# Altium PCB ePBR22_ACC_Charging.PcbDoc (part 3 of 3)
Units mil, origin at the board's own origin, x right, y up, seen from the top; angles counter-clockwise.
Board outline 10580 x 3865 mil, 2 copper layers (Top Layer, Bottom Layer); 147 components, 103 nets, 520 pads, 142 vias.
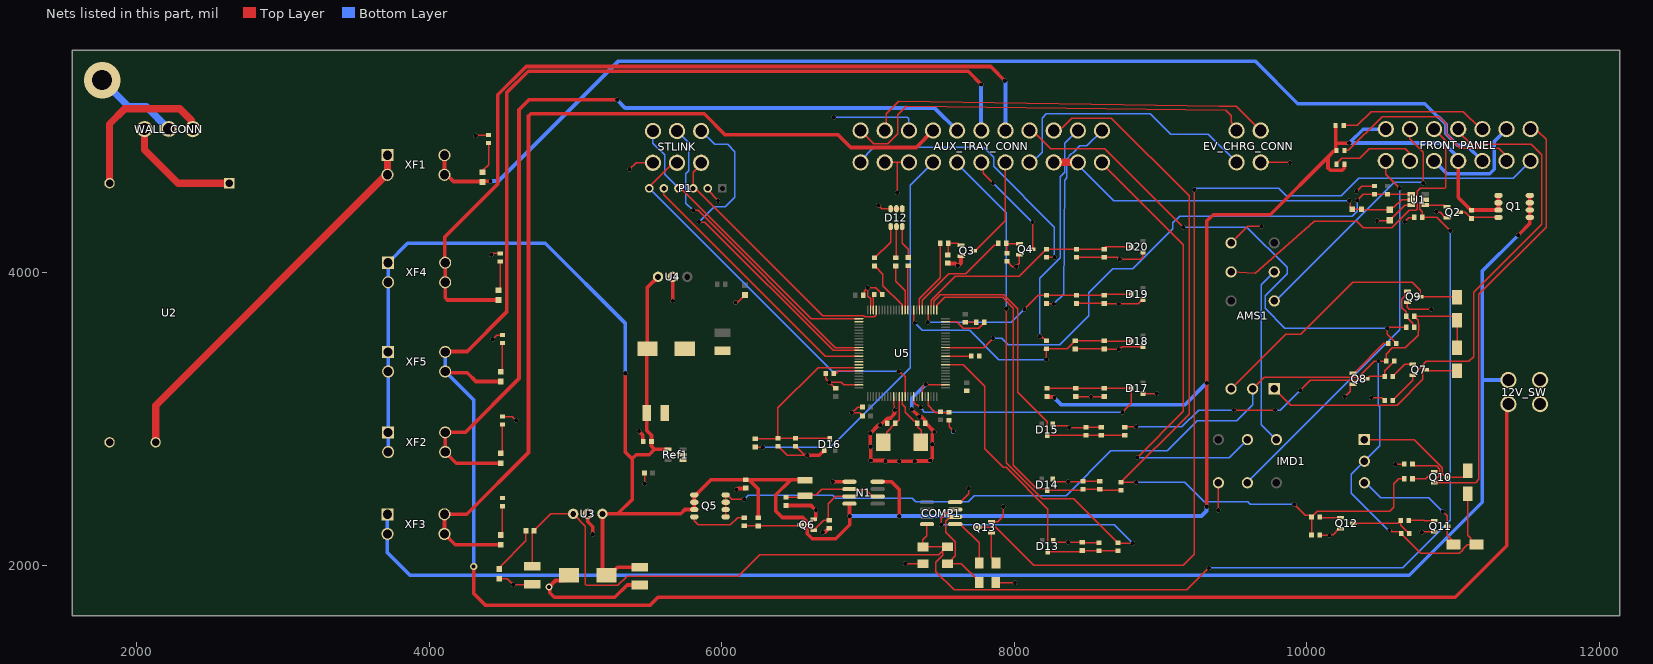
[diagram p2: the nets of this part, all layers, seen from the top]

## Via types
v1: diameter 30, hole 30, Top Layer to Bottom Layer, 126 vias
v2: diameter 178, hole 128, Top Layer to Bottom Layer, 10 vias
v3: diameter 250, hole 137, Top Layer to Bottom Layer, 4 vias
v4: diameter 50, hole 28, Top Layer to Bottom Layer, 2 vias

## Nets (pads, with @x,y where several pads share a name; then routed paths per layer and width w, separated by ;. In a path a pad name is that pad's centre, name@x,y a point inside that pad or via, vN(x,y) a via of type N, cw(c..) or ccw(c..) an arc to the next point about the centre after c; other vN are vias at no path point) (continued)
5V: C1.1 C6.2 C29.2 COMP1.8 R18.1 R59.1 U1.5 U3.3 | length 10293.3
  Top Layer w10: C6.2@4705,1991.01 4705,2220.46 4717.56,2233.02 R18.1@4717.56,2234.99 4717.56,2236.96 4830.59,2349.99 U3.3@4985,2349.99 5068.09,2266.9 5068.09,1866.91 5074,1861 5291,1861 5355,1925 6115,1925 6260,2070 7483.07,2070 R59.1@7512.6,2099.53 ; COMP1.8@7403.54,2280 7403.54,2201.46 7375,2172.91 C29.2@7375,2123.82 7379.02,2123.82 R59.1@7536.89,2123.82 ; R59.1@7545,2124.06 7544.76,2123.82 R59.1@7536.89,2123.82 ; v1(9330,1980) 9180,1830 7909.19,1830 7908.92,1829.72 7839.19,1829.72 7838.92,1830 7795.02,1830 7794.74,1829.72 7725.02,1829.72 7724.75,1830 7590,1830 7465,1955 7465,2020.56 7512.6,2068.15 R59.1@7512.6,2099.53 ; U1.5@10809.49,4497.4 10800.71,4488.62 10785.01,4488.62 10783.04,4486.65 10778.57,4486.65 10771.02,4479.11 10771.02,4433.98 10789.8,4415.2 C1.1@10789.8,4377.4 10887.6,4377.4 v1(10980,4285) ; R59.1@7512.6,2099.53 R59.1@7536.89,2123.82
  Bottom Layer w10: v1(9330,1980) 10655,1980 10980,2305 v1(10980,4285)
5V_ON: D2.1 R18.2 | length 320
  Top Layer w10: D2.1@4485,1988.45 4662.44,2165.9 R18.2@4662.44,2234.99
12V: "FRONT PANEL.1" "FRONT PANEL.11" C2.1 C3.1 C4.2 C5.2 C9.2 C10.1 N1.4 N1.8 Q1.1 Q1.2 Q1.3 Q5.1 Q5.2 Q5.3 R1.2 R2.2 R3.1 R8.2 R21.2 R23.2 R51.1 Ref1.4 U3.1 U4.1 XF2.1 XF2.2 XF4.1 XF4.2 XF5.1 XF5.2 | length 18910.6
  Top Layer w25: v1(5340,3310) 5340,2775 5387.76,2727.24 ; 5390,2729.57 5390,2729.47 ; C5.2@5440,1986.02 5288.67,1986.02 5232.64,1929.99 C3.1@5212.95,1929.99 5185,1957.94 U3.1@5185,2349.99 5289.99,2349.99 ; 5540,2790 5505,2755 5415.53,2755 5390,2729.47 ; U4.1@5565,3969.99 5492.05,3897.04 C2.1@5492.05,3479.99 5488.98,3476.92 C4.2@5488.98,3040 5488.98,2917.75 5520,2886.72 5520,2845 5520,2813.15 5540.75,2792.4 Ref1.4@5633.43,2792.4 ; Q5.1@5812.72,2479.65 Q5.2@5812.72,2429.65 Q5.3@5812.72,2379.65 5749.65,2379.65 5719.99,2349.99 5289.99,2349.99 ; Q5.1@5823.54,2479.65 5926.1,2582.2 R23.2@6165,2582.2 6187.8,2582.2 ; R21.2@6250,2322.56 6250,2520 6187.8,2582.2 ; C10.1@6570,2580 6567.8,2582.2 6471.61,2582.2 ; N1.4@6873.54,2419.65 6874.27,2418.92 6874.27,2335.73 v1(6875,2335) 6875,2275 6780,2180 6620,2180 6585,2215 6585,2295 6555,2325 6415,2325 6370,2370 6370,2480.59 6471.61,2582.2 ; N1.8@7066.46,2569.65 7160.71,2569.65 7215,2515.36 v1(7215,2335) ; R51.1@8225,3152.44 8228.25,3149.19 8267.15,3149.19 8273.65,3142.69 v1(8275,3142.69) ; v1(9315,2400) v1(9315,3244.68) 9315,4350 9360,4395 9750,4395 10145,4790 ; R1.2@10197.44,5005 10197.44,4884.04 ; R3.1@10202.44,4835 10202.44,4831.06 10201.16,4829.78 10184.78,4829.78 10145,4790 ; R3.1@10202.44,4838.94 10197.44,4843.94 10197.44,4884.04 ; R2.2@10257.56,4740 10256.28,4738.72 10256.28,4714.64 10241.63,4700 10159.64,4700 10145,4714.64 10145,4790 ; v1@10289.06,4884.04 10197.44,4884.04 ; 11035,4765.89 11035,4763 11035,4513.39 11120.87,4427.52 11122.83,4427.52 R8.2@11126.08,4424.28 11128.58,4426.77 Q1.3@11309.96,4426.77 Q1.2@11309.96,4476.77 Q1.1@11309.96,4526.77 ; 5289.99,2349.99 5390,2450 5390,2729.47 ; 6187.8,2582.2 6471.61,2582.2
  Bottom Layer w25: XF2.2@3720.12,2773.07 XF2.1@3720.12,2906.93 XF5.2@3720.12,3323.07 XF5.1@3720.12,3456.93 XF4.2@3720.12,3933.07 XF4.1@3720.12,4066.93 3853.19,4200 4795,4200 5340,3655 v1(5340,3310) ; v1(6875,2335) v1(7215,2335) 9280,2335 9314.04,2369.04 9314.04,2399.04 v1(9315,2400) ; v1(8275,3142.69) 8322.69,3095 9165.32,3095 v1(9315,3244.68) ; 10540,4980 10385.01,4980 v1(10290.01,4885) 10887.19,4885 10890.94,4884.72 10944.71,4876.56 11040.77,4780.5
12V_TO_ENBLSW: "FRONT PANEL.12" D1.1 XF1.3 XF1.4 | length 7894.1
  Top Layer w25: XF1.3@4104.88,4801.93 XF1.4@4104.88,4668.07 4120.49,4668.07 4166.46,4622.1 D1.1@4359.03,4622.1 ; D1.1@4370.97,4624.04 4419.04,4624.04 v1(4420,4625)
  Bottom Layer w25: v1@4422.31,4625 4475,4625 5295,5445 9647.26,5445 9938.58,5153.69 10805.84,5153.69 10898.54,5060.99 10903.55,5060.99 10950.99,5013.55 10950.99,4949.01 11031.26,4868.74 11094.26,4868.74 11200,4763
A\M\S\_\O\K\: AUX_TRAY_CONN.8 R28.1 R31.1 | length 3631.4
  Top Layer w10: AUX_TRAY_CONN.8@8105,4970 8125,4970 8249.84,4845.16 8619.84,4845.16 v1(9155,4310) ; v1(10550,3620) 10550,3579.53 10612.56,3516.97 R28.1@10612.56,3515 ; v1@10560,3625 10560.55,3625.55 R31.1@10679.88,3625.55
  Bottom Layer w10: v1(9155,4310) 9590,4310 9865,4035 9865,3992.13 9715,3842.13 9715,3755 9850,3620 v1(10550,3620)
AIR+_CTRL: AUX_TRAY_CONN.18 Q3.3 | length 699.2
  Top Layer w10: Q3.3@7724.29,4149.65 7735.12,4149.65 7940.08,4354.61 AUX_TRAY_CONN.18@7940.08,4753.08
AIR+_FB: AUX_TRAY_CONN.11 R55.1 | length 1415.6
  Top Layer w10: R55.1@8207.28,3777.33 8218.03,3788.08 R55.1@8220,3788.08 8223.08,3785 v1(8270,3785)
  Bottom Layer w10: v1(8270,3785) 8337.12,3852.12 8343.68,4631.49 8360,4647.81 8360,4776.92 8368.52,4785.45 8373.05,4792.54 cw(c8435,4753) 8395.46,4814.95 8402.56,4819.48 8449.4,4866.33 8496.33,4866.33 AUX_TRAY_CONN.11@8600,4970
AIR-_CTRL: AUX_TRAY_CONN.17 Q4.3 | length 741.6
  Top Layer w10: AUX_TRAY_CONN.17@7775,4753 7787.91,4740.09 7787.91,4677.09 v1(7855,4610) ; Q4.3@8124.29,4159.65 8125,4160.35 v1(8125,4345)
  Bottom Layer w10: v1(7855,4610) 7857.5,4610 8122.5,4345 v1(8125,4345)
AIR-_FB: AUX_TRAY_CONN.12 R57.1 | length 1895.3
  Top Layer w10: R57.1@8220,4104.75 8220.25,4105 v1(8275,4105)
  Bottom Layer w10: AUX_TRAY_CONN.12@6950,4753 6950,4765 7040,4855 7790,4855 7858.69,4786.31 7858.69,4726.31 8275,4310 v1(8275,4105)
AMS_CHG_SAFETY: AUX_TRAY_CONN.19 EV_CHRG_CONN.3 | length 1839
  Bottom Layer w10: AUX_TRAY_CONN.19@8105,4753 8120.13,4753 8190,4822.88 8190,5055 8220,5085 8930.82,5085 9069.53,4946.29 9326.71,4946.29 EV_CHRG_CONN.3@9520,4753 EV_CHRG_CONN.3@9529.16,4743.84
AMS_CHR_PWR: AUX_TRAY_CONN.4 D7.1 XF3.3 XF3.4 | length 6514.6
  Top Layer w25: D7.1@4490,2139.15 4178.8,2139.15 XF3.4@4104.88,2213.07 XF3.3@4104.88,2346.93 4256.93,2346.93 4680,2770 4680,5070.36 4694.64,5085 5880.29,5085 6024.77,4940.51 6796.88,4940.51 6882.77,4854.63 7329.63,4854.63 AUX_TRAY_CONN.4@7445,4970
AMS_CHR_PWR_FUSE: 12V_SW.3 Q1.5 Q1.6 Q1.7 Q1.8 XF3.1 XF3.2 | length 10409.6
  Top Layer w25: v1(11445,4255) 11524.53,4334.53 Q1.5@11524.53,4376.77 ; Q1.5@11524.53,4390 Q1.6@11524.53,4426.77 Q1.7@11524.53,4476.77 Q1.8@11524.53,4526.77
  Bottom Layer w10: 11200,3265.35 11200,3271.54
  Bottom Layer w25: XF3.1@3715.12,2346.93 XF3.2@3715.12,2213.07 3715.12,2084.88 3870,1930 10700,1930 11200,2430 11200,3265.35 12V_SW.3@11373.46,3265.35 ; 11200,3271.54 11200,4010 v1(11445,4255)
AMS_CHRG_CTRL: R9.1 R10.2 U1.1 U5.40 | length 3814
  Top Layer w10: U5.40@7530.47,3487.13 7792.13,3487.13 v1(7855,3550) ; v1(10345,4495) 10384.84,4534.84 R9.1@10552.24,4534.84 ; R9.1@10552.26,4534.82 U1.1@10715,4534.8
  Bottom Layer w10: v1(7855,3550) 7915,3550 7960,3505 8310,3505 8510,3705 8510,3860 8675,4025 8810,4025 9085,4300 9085,4340 9130,4385 10310,4385 10345,4420 v1(10345,4495)
AMS_ERR_PIN: AMS1.A2 D5.1 Q9.3 | length 1915.8
  Top Layer w10: AMS1.A2@9482.36,3204.76 9854.74,3577.14 9957.42,3577.14 10315.28,3935 10720,3935 10776.73,3878.27 Q9.3@10776.73,3835.55 11022.44,3835.55 D5.1@11027.44,3830.55
AMS_LED: "FRONT PANEL.3" AMS1.21 | length 2236.7
  Top Layer w10: AMS1.21@9482.36,4003.98 9644.1,3993.92 9644.41,3993.9 9648.5,3993.9 10047.52,4346.2 10051.57,4348.7 10217.35,4348.7 10218.13,4349.48 10244.89,4349.48 10245.67,4348.7 10341.62,4348.7 10385.33,4305 10533.46,4305 ; 10535,4305 10580,4305 10699.45,4424.45 10745.64,4424.45 10755.12,4433.93 10755.12,4555.12 10775,4575 10944.14,4575 10950,4580.86 10950,4900 10902.5,4947.5 10870,4980
AMS_OK: Q8.3 R26.2 R27.1 R47.1 | length 2053.5
  Top Layer w10: R47.1@8755,2942.2 8757.8,2945 v1(8835,2945) ; v1(9500,3060) v1(9785,3060) ; v1(9955,3195) 10025,3265 10356.65,3265 10366.65,3275 10415.12,3275 10430.12,3290 R27.1@10532.44,3290 10532.44,3327.91 10597.56,3393.03 R26.2@10597.56,3395
  Bottom Layer w10: v1(8835,2945) 9145,2945 9260,3060 v1(9500,3060) ; v1(9785,3060) 9820,3060 v1(9955,3195)
AMS_PWR: 12V_SW.4 AUX_TRAY_CONN.6 D9.1 XF5.3 XF5.4 | length 16060.2
  Top Layer w25: XF5.4@4109.88,3323.07 4117.95,3315 4260,3315 4320.61,3254.39 D9.1@4490,3254.39 ; XF5.3@4109.88,3456.93 4112.95,3460 4260,3460 4530,3730 4530,5227.97 4677.02,5375 7685,5375 v1(7775,5285) ; v4(4305,1990) 4305,1805 4385,1725 5510,1725 5565,1780 11015,1780 11366.86,2131.86 11366.86,3088.86 12V_SW.4@11378,3100
  Bottom Layer w25: XF5.3@4109.88,3456.93 XF5.4@4109.88,3323.07 4305,3127.95 v4(4305,1990) ; AUX_TRAY_CONN.6@7770,4978.85 7772.69,4981.54 7772.69,5281.34 7775,5283.65 v1(7775,5285)
AMS_RST: "FRONT PANEL.4" Q7.2 R29.2 | length 2912.4
  Top Layer w10: R29.2@10587.56,3125 10587.56,3126.97 10723.15,3262.56 Q7.2@10723.15,3298.15 10733.98,3298.15 10740.79,3304.96 10740.79,3314.48 10776.22,3349.91 10776.22,3352.69 10783.76,3360.24 10786.55,3360.24 10818.16,3391.85 11106.85,3391.85 11140,3425 11140,3865 11605,4330 11605,4805 11535,4875 11125,4875 11036.67,4963.33
AMS_RST_PIN: AMS1.A1 D4.1 Q7.3 | length 1434.4
  Top Layer w10: AMS1.A1@9777.64,3204.76 9889.21,3093.19 10618.19,3093.19 10794.09,3269.09 10794.09,3328.74 10800.91,3335.55 Q7.3@10811.73,3335.55 10822.56,3335.55 10830.04,3328.07 D4.1@11027.44,3328.07
BL1: D12.6 R42.2 | length 227.9
  Top Layer w10: D12.6@7234.37,4313.62 7234.37,4198.43 7275,4157.8 R42.2@7275,4102.56
BOOT0: R38.1 U5.37 | length 175.2
  Top Layer w10: U5.37@7530.47,3428.07 7703.43,3428.07 R38.1@7705,3429.65
CHRG_LED_PWR: "FRONT PANEL.13" R3.2 | length 1423.7
  Top Layer w10: R3.2@10257.56,4835 10285,4835 10515,5065 10902.82,5065 10952.18,5015.65 10952.18,4947.82 11050,4850 11313,4850 11382.5,4780.5 11415,4748
GL1: D12.5 R41.2 | length 215.9
  Top Layer w10: R41.2@7190,4099.76 7195,4104.76 D12.5@7195,4313.62
GND: 12V_SW.1 12V_SW.2 "FRONT PANEL.6" "FRONT PANEL.10" AMS1.24 AUX_TRAY_CONN.3 AUX_TRAY_CONN.13 AUX_TRAY_CONN.14 C1.2 C2.2 C3.2 C4.1 C5.1 C6.1 C7.1 C8.1 C9.1 C11.1 C12.1 C13.2 C14.1 C15.1 C16.1 C17.1 C18.1 C19.1 C20.1 C21.1 C22.1 C23.1 C24.1 C25.1 C26.1 C27.1 C28.1 C29.1 C30.1 COMP1.4 D2.2 D3.2 D12.1 D12.2 D12.3 D13.1 D14.1 D15.1 D16.1 D17.1 D18.1 D19.1 D20.1 EV_CHRG_CONN.4 IMD1.24 N1.1 P1.2 Q2.2 Q3.2 Q4.2 Q6.2 Q8.2 Q9.2 Q11.2 Q12.2 Q13.2 R4.2 R5.2 R6.2 R7.2 R10.1 R12.1 R14.1 R16.1 R17.2 R23.1 R24.1 R25.1 R29.1 R33.1 R37.2 R38.2 R39.2 R44.1 R46.1 R48.1 R50.1 R52.1 R54.1 R56.1 R58.1 R60.1 Ref1.1 Ref1.2 STLINK.4 U1.3 U2.3 U3.2 U4.2 U5.10 U5.20 U5.27 U5.74 U5.99 | length 13649.6
  Top Layer w10: U2.3@1813.46,2837.09 U2.3@1815.55,2839.17 ; v1(4320,4935) 4322.32,4937.32 4404.46,4937.32 R17.2@4406.78,4939.65 ; v1@4426.35,4120 4436.47,4130.12 R4.2@4486.78,4130.12 ; v1@4436.35,3545 4462.57,3571.22 R6.2@4500.5,3571.22 ; D2.2@4480,1906.53 4533.47,1906.53 v1(4575,1865) 4701.03,1865 C6.1@4705,1868.97 ; R5.2@4501.78,3014.88 4568.76,3014.88 v1@4593.65,2990 ; v1(5370,4705) 5415,4750 STLINK.4@5530,4750 ; C8.1@5472.44,2630 5475,2627.44 v1(5475,2555) ; P1.2@5905,4575 5905,4565.41 5975,4495.41 v1(5975,4490) ; v1@6095.96,3795.96 6109.42,3795.96 D3.2@6160,3846.53 ; R50.1@6386.97,2812.09 6449.06,2750 v1(6585,2750) ; C24.1@6506.97,2812.09 6568.1,2750.96 ; R39.2@6712.44,3308.03 6712.44,3272.56 v1(6735,3250) v1@6735.59,3250 ; C20.1@6778.03,3207.56 v1@6735.59,3250 ; U5.99@6937.95,3231.22 6835.86,3231.22 6817.08,3250 v1@6735.59,3250 ; C19.1@6962.44,3020 6962.44,3021.97 6951.69,3032.72 6949.72,3032.72 6942.44,3040 v1(6890,3040) 6930,3080 C15.1@6962.44,3080 ; C18.1@6967.56,3844.65 6975.94,3853.03 6975.94,3870.94 v1(7000,3895) ; U5.74@7017.68,3744.02 7017.68,3819.74 7000,3837.42 v1(7000,3895) ; v1@7071.35,4460 7095.68,4435.67 D12.3@7155.63,4435.67 D12.2@7195,4435.67 D12.1@7234.37,4435.67 ; C14.1@7097.56,3849.65 7097.56,3851.61 7054.17,3895 v1(7000,3895) ; AUX_TRAY_CONN.13@7115,4753 7197.5,4753 ; U5.10@7175.16,3151.5 7175.16,3095 7180.16,3090 7180.16,3062.56 v1(7182.72,3060) ; v1(7200,4545) 7200,4750.5 7197.5,4753 ; v1(7255,2010) 7374.65,2010 C29.1@7375,2009.65 ; AUX_TRAY_CONN.14@7280,4753 7197.5,4753 ; U5.20@7372.01,3151.5 7372.01,3212.01 v1(7395,3235) 7398.7,3231.3 7530.39,3231.3 U5.27@7530.47,3231.22 U5.27@7530.55,3231.14 ; C12.1@7555,2990 7555,2945 v1(7585,2915) ; COMP1.4@7631.89,2430 7689.04,2487.15 v1@7689.04,2524.04 ; C16.1@7665,3659.65 C11.1@7739.88,3659.65 ; Q13.2@7844.29,2297.05 7887.05,2297.05 7924.04,2334.04 v1@7924.04,2399.04 ; R60.1@7874.06,1880 v1(8005,1880) ; R16.1@7951.97,4077.09 7988.1,4040.96 v1@8014.04,4040.96 ; v1@8015,4041.35 8035.71,4062.06 Q4.2@8035.71,4122.24 ; D14.1@8262.4,2589.02 8262.4,2587.05 8273.15,2576.3 8275.12,2576.3 8281.42,2570 v1(8370,2570) 8467.8,2570 C22.1@8470,2572.2 R46.1@8585,2572.2 ; D15.1@8262.4,2964.02 8262.4,2962.05 8273.15,2951.3 8358.29,2951.3 8369.59,2940 8487.8,2940 C23.1@8490,2942.2 R48.1@8595,2942.2 ; D13.1@8267.4,2169.02 8267.4,2167.05 8278.15,2156.3 8280.12,2156.3 8281.42,2155 v1(8370,2155) 8464.76,2155 C21.1@8465,2154.76 8467.56,2152.2 R44.1@8580,2152.2 ; R54.1@8417.71,3477.09 C26.1@8615.42,3477.09 8617.51,3475 v1(8715,3475) 8719.6,3475 8738.52,3493.91 D18.1@8879.37,3493.91 ; R52.1@8420,3152.44 8422.44,3150 v1(8525,3150) 8612.56,3150 C25.1@8615,3152.44 C25.1@8617.56,3155 ; R56.1@8425,3788.08 C27.1@8615.42,3788.08 8618.5,3785 v1(8715,3785) 8846.82,3785 8877.4,3815.58 D19.1@8879.37,3815.58 ; R58.1@8425,4104.75 C28.1@8615.42,4104.75 8703.9,4104.75 v1@8718.65,4090 ; v1(8720,4090) 8864.73,4090 8879.37,4104.64 D20.1@8879.37,4137.24 ; D17.1@8879.37,3172.24 8881.61,3170 v1(8975,3170) ; v1(9395,2375) 9395.35,2375.35 9395.35,2562.01 IMD1.24@9395.71,2562.36 ; AMS1.24@9482.36,4202.4 9594.96,4315 v1(9690,4315) ; EV_CHRG_CONN.4@9685,4753 9882,4753 v1(9885,4750) ; R37.2@10087.56,2205 v1(10155,2205) 10158.83,2208.83 10179.54,2208.83 10219.17,2248.46 Q12.2@10230,2248.46 ; v1(10260,3150) 10298.07,3188.07 10298.07,3230.79 10304.88,3237.6 Q8.2@10315.71,3237.6 ; v1(10340,4555) 10374.96,4589.96 R10.1@10462.24,4589.96 ; v1(10440,3145) 10512.44,3145 10519.72,3137.72 10521.69,3137.72 10532.44,3126.97 R29.1@10532.44,3125 ; v1(10480,4355) 10565.28,4355 10670.28,4460 U1.3@10715,4460 ; v1(10605,2690) R33.1@10667.44,2690 ; v1(10670,4345) 10670,4348.44 10696.99,4375.43 10732.72,4375.43 C1.2@10734.68,4377.4 ; Q9.2@10688.15,3798.15 10688.15,3761.85 10700,3750 v1(10850,3750) ; v1(10785,2225) 10786.73,2226.73 10868.98,2226.73 Q11.2@10870.71,2228.46 ; v1(10885,4415) 10888.83,4411.17 10910.95,4411.17 10947.13,4375 Q2.2@10957.95,4375
  Top Layer w25: v1(4425,4120) v1@4426.35,4120 ; v1(4435,3545) v1@4436.35,3545 ; R6.2@4500.5,3571.22 R6.2@4501.78,3572.5 ; v1@4593.65,2990 v1(4595,2990) ; C3.2@4957.05,1929.99 4921.25,1894.19 4864.19,1894.19 v4(4820,1850) 4824.78,1845.22 4824.78,1811.28 4856.07,1780 5270,1780 5353.98,1863.98 C5.1@5440,1863.98 ; U3.2@5085,2349.99 5085,2295.62 5119.04,2261.58 5119.04,2210.96 v1(5120,2210) ; v1(5435,2915) 5435,2913.65 5461.75,2886.9 5461.75,2848.25 C9.1@5465,2845 ; C4.1@5611.02,3040 C4.1@5611.02,3065.59 ; v1(5665,3805) U4.2@5665,3969.99 ; v1(6095,3795) v1@6095.96,3795.96 ; v1(6100,2515) 6101.35,2515 6110.19,2523.84 6161.75,2523.84 R23.1@6165,2527.09 ; R50.1@6385,2812.09 R50.1@6386.97,2812.09 ; R25.1@6440,2407.44 6611.21,2407.44 6643.65,2375 v1(6645,2375) ; C24.1@6505,2812.09 C24.1@6506.97,2812.09 ; v1(6585,2750) 6667.32,2750 6697.38,2780.06 6699.35,2780.06 6702.6,2783.31 D16.1@6702.6,2785.28 ; Q6.2@6629.29,2312.05 6638.74,2312.05 6639.43,2312.74 6639.43,2322.19 6644.04,2326.8 v1@6644.04,2374.04 ; v1@6690.96,2225.96 6706.55,2225.96 6733.03,2252.44 R24.1@6735,2252.44 ; R39.2@6712.44,3308.03 R39.2@6712.44,3310 ; v1(6760,2570) 6760.18,2569.82 6873.37,2569.82 N1.1@6873.54,2569.65 ; C20.1@6778.03,3207.56 C20.1@6780,3207.56 ; 7069.04,2954.04 v1(7015,2900) 7015,2816.35 7020,2811.35 v1(7020,2715) 7113.65,2715 7118.65,2710 v1(7215,2710) ; v1(7070,4460) v1@7071.35,4460 ; v1(7085,2955) 7134.4,3004.4 7153.7,3004.4 7154.65,3005.36 ; 7155,3005 7155,3007.05 7181.76,3033.81 7181.76,3059.04 v1(7182.72,3060) ; v1@7216.35,2708.65 7216.75,2709.04 7219.49,2709.04 7219.89,2708.65 7317.29,2708.65 7317.69,2709.04 7318.25,2709.04 v1@7318.65,2708.65 ; v1(7300,3065) v1(7350,3015) ; v1@7321.35,2708.65 7321.35,2710 7322.31,2710.96 7417.42,2710.96 7420.51,2714.04 7423.25,2714.04 v1@7423.65,2713.65 ; v1@7350.96,3014.04 7365.96,3014.04 7389.31,2990.69 7389.31,2973.25 C30.1@7392.56,2970 ; C30.1@7392.8,2972.2 v1(7455,2910) 7455,2908.65 7439.94,2893.59 7439.94,2825.06 v1@7440,2825 ; v1(7425,2715) 7425,2716.35 7440,2731.35 7440,2824.94 v1(7439.94,2825) ; R14.1@7545,4064.65 7548.25,4061.4 7597.25,4061.4 7613.65,4045 v1(7615,4045) 7635.71,4065.71 Q3.2@7635.71,4112.24 ; COMP1.4@7596.46,2430 COMP1.4@7631.89,2430 ; v1@7689.04,2524.04 v1(7690,2525) ; R38.2@7760.12,3427.68 R38.2@7760.12,3429.65 ; Q13.2@7844.29,2297.05 Q13.2@7853.74,2297.05 ; v1@7924.04,2399.04 v1(7925,2400) ; R16.1@7950,4077.09 R16.1@7951.97,4077.09 ; v1@8014.04,4040.96 v1(8015,4040) ; v1@8718.65,4090 v1(8720,4090)
  Top Layer w50: U2.3@1813.29,2836.91 U2.3@1813.46,2837.09
  Bottom Layer w10: v1(6765,5060) 7270,5060 7280,5050 AUX_TRAY_CONN.3@7280,4970
  Bottom Layer w25: v1(7300,3065) 7300,3140 v1(7395,3235) ; v1@7578.65,2910 7583.65,2915 v1(7585,2915) ; 10870,4763 10958,4675 11250,4675 11280.99,4705.99 11280.99,4895.99 11365,4980
  other v1: 6690,2225 7120,2710 7320,2710 7020,2810 8375,2940
GND_PWR: WALL_CONN.2 | length 593.8
  Bottom Layer w50: v3(1765,5315) 1945.8,5134.2 2065.8,5134.2 WALL_CONN.2@2220,4980
HV_CURR_SENS: AUX_TRAY_CONN.16 COMP1.3 R43.2 | length 4817.8
  Top Layer w10: v1(7500,2275) 7500,2318.98 7561.02,2380 COMP1.3@7596.46,2380 ; v1(7945,3751.81) 7945,2700 8192.83,2452.17 8408.07,2452.17 8708.03,2152.2 R43.2@8710,2152.2 8712.2,2150 v1(8810,2150)
  Bottom Layer w10: v1(7500,2275) 8685,2275 v1(8810,2150) ; AUX_TRAY_CONN.16@7600.3,4754.7 7945,4410 v1(7945,3751.81)
HVB_PWR: AUX_TRAY_CONN.7 D6.1 XF4.3 XF4.4 | length 5847.9
  Top Layer w25: XF4.3@4107.84,4066.93 4107.84,4242.84 4470,4605 4470,5214.47 4663.41,5407.87 7838.98,5407.87 7886.51,5360.34 7886.51,5358.49 v1(7935,5310) ; XF4.3@4110,4066.93 4110,3933.07 4110,3826.65 4124.64,3812.01 D6.1@4475,3812.01
  Bottom Layer w25: v1(7935,5310) 7935,5308.65 7940,5303.65 AUX_TRAY_CONN.7@7940,4959.82
IMD_ERR_PIN: D11.1 IMD1.A2 Q11.3 | length 882.4
  Top Layer w10: v1(10930,2365) 10959.29,2335.71 10959.29,2203.58 11000,2162.87 D11.1@11000,2130
  Bottom Layer w10: IMD1.A2@10393.35,2562.36 10402.64,2562.36 10505,2460 10835,2460 v1(10930,2365)
IMD_LED: "FRONT PANEL.8" IMD1.21 | length 2685.9
  Top Layer w10: 10540,4763 10540,4670 v1(10635,4575)
  Bottom Layer w10: IMD1.21@9578.91,2553.91 10635,3610 v1(10635,4575)
IMD_OK: AUX_TRAY_CONN.9 R32.1 R36.2 R37.1 R45.1 | length 5693.8
  Top Layer w10: AUX_TRAY_CONN.9@8270,4970 8289.33,4989.33 8329.33,4989.33 8394.5,5054.5 8664.41,5054.5 9195,4523.91 9195,3032.2 8742.72,2579.92 8742.72,2577.95 8731.97,2567.2 R45.1@8730,2567.2 8732.2,2565 v1(8835,2565) ; v1(9915,2415) 9989.14,2340.86 10021.69,2340.86 10032.44,2330.12 R36.2@10032.44,2328.27 ; R37.1@10032.44,2205 R36.2@10032.44,2328.27 ; R32.1@10667.44,2590 10630,2590 10595,2555 10595,2395.86 10567.56,2368.42 10070.63,2368.42 10032.44,2330.24 R36.2@10032.44,2328.27
  Bottom Layer w10: v1(8835,2565) 9165,2565 9298.19,2431.81 9595.48,2431.81 9612.29,2415 v1(9915,2415)
IMD_PWR: AUX_TRAY_CONN.5 D8.1 XF2.3 XF2.4 | length 6150.7
  Top Layer w25: D8.1@4490,2696.77 4186.18,2696.77 XF2.4@4109.88,2773.07 XF2.3@4109.88,2906.93 4246.93,2906.93 4615,3275 4615,5112.73 4682.27,5180 v1(5285,5180)
  Bottom Layer w25: v1(5285,5180) 5340,5125 5611.54,5125 5941.54,5125 6868.46,5125 7455,5125 AUX_TRAY_CONN.5@7610,4970
IMD_RESIST_IN: AUX_TRAY_CONN.15 R49.2 | length 2753.8
  Top Layer w10: R49.2@6230,2807.44 6232.09,2805.35 v1(6280,2805.35)
  Bottom Layer w10: v1@6280,2805 6745.01,2805 7288.19,3348.18 7288.19,4596.19 AUX_TRAY_CONN.15@7445,4753
IMD_RST: "FRONT PANEL.7" Q10.2 R33.2 | length 3211.6
  Top Layer w10: R33.2@10722.56,2690 10722.56,2688.03 10733.31,2677.28 10887.35,2677.28 10908.35,2656.29 10908.35,2613.35 10888.35,2593.35 10888.35,2570.28 Q10.2@10881.54,2563.46 ; Q10.2@10870.71,2563.46 Q10.2@10881.54,2563.46 ; 11579.9,4965 11635.28,4909.62 11635.28,4310.28 11175,3850 11175,2585 11153.46,2563.46 Q10.2@10881.54,2563.46
IMD_RST_PIN: D10.1 IMD1.A1 Q10.3 | length 862.8
  Top Layer w10: IMD1.A1@10393.35,2855 10734.92,2855 10926.22,2663.7 10926.22,2623.11 10948.46,2600.87 Q10.3@10959.29,2600.87 11071.54,2600.87 11100,2629.33 D10.1@11100,2644.61
LATCHING_Delayed: AMS1.A3 D4.2 D5.2 D10.2 D11.2 IMD1.A3 Q5.5 Q5.6 Q5.7 Q5.8 R26.1 R30.1 R34.1 | length 8533.5
  Top Layer w10: Q5.5@6027.28,2329.65 Q5.6@6027.28,2379.65 Q5.7@6027.28,2429.65 Q5.8@6027.28,2479.65 6038.11,2479.65 6067.76,2450 v1(6155,2450) ; AMS1.A3@9630,3204.76 9710.24,3285 10350,3285 10460,3395 v1(10490,3395) R26.1@10542.44,3395 10542.44,3442.44 10584.41,3484.41 10674.41,3484.41 10761.65,3571.65 10761.65,3600.53 10763.62,3602.5 10763.62,3648.6 10761.65,3650.57 10761.65,3671.93 10735,3698.58 R30.1@10735,3700.55 10999.96,3700.55 D5.2@11027.44,3673.07 D4.2@11027.44,3485.55 ; v1(10565,2240) 10570.41,2240 10582.7,2227.72 10634.25,2227.72 10645,2216.97 R34.1@10645,2215 ; R34.1@10645,2213.03 10778.03,2080 11043.41,2080 11064.61,2101.19 11064.61,2106.97 11097.63,2139.99 D11.2@11160,2139.99 ; D10.2@11100,2487.13 11100,2205 11122.4,2182.6 11122.4,2168.45 11140.86,2150 D11.2@11155,2150
  Bottom Layer w10: v1(6155,2450) 6182.19,2477.19 6759.44,2477.19 6778.74,2457.89 7304.58,2457.89 7328.39,2434.08 7685.65,2434.08 7726.56,2475 8355.07,2475 8660.07,2780 9045,2780 9250,2985 9520,2985 9630,3095 AMS1.A3@9630,3204.76 ; v1(10490,3395) 10490,3093.12 10500,3083.12 10500,2816.65 IMD1.A3@10393.35,2710 10305,2621.65 10305,2490 10551.17,2243.83 10561.17,2243.83 v1(10565,2240)
LED_B1: R42.1 U5.61 | length 304
  Top Layer w10: U5.61@7273.58,3744.02 7273.58,4046.02 R42.1@7275,4047.44
LED_G1: R41.1 U5.62 | length 352.7
  Top Layer w10: R41.1@7190,4044.65 7190,3939.45 7253.9,3875.55 U5.62@7253.9,3718.41
LED_R1: R40.1 U5.63 | length 380.2
  Top Layer w10: R40.1@7045,4044.65 7046.97,4044.65 7102.8,3988.81 7102.8,3909.51 7234.21,3778.09 U5.63@7234.21,3744.02
NetAUX_TRAY_CONN_1: AUX_TRAY_CONN.1 EV_CHRG_CONN.1 | length 2885.5
  Top Layer w10: AUX_TRAY_CONN.1@6950,4970 7040,4880 7135,4880 7202.47,4947.47 7202.47,5077.22 7261.28,5136.03 7265.48,5136.03 9445.24,5109.76 9485,5070 9485,5026.36 9520,4991.36 EV_CHRG_CONN.1@9520,4970
NetAUX_TRAY_CONN_2: AUX_TRAY_CONN.2 EV_CHRG_CONN.2 | length 2783.5
  Top Layer w10: AUX_TRAY_CONN.2@7115,4970 7124.47,4979.47 7124.47,5084.47 7210.8,5170.8 9399.8,5137.05 9519.39,5135.61 9585.72,5069.28 EV_CHRG_CONN.2@9685,4970
NetC21_2: C21.2 D13.3 R43.1 R44.2 U5.34 | length 2109.7
  Top Layer w10: U5.34@7555.98,3369.09 7556.89,3370 7649.99,3370 7798.62,3221.37 7798.62,2795.47 7926.36,2667.73 7944.07,2667.73 8230,2381.8 D13.3@8230,2090.28 8455.63,2090.28 C21.2@8465,2099.65 8467.56,2097.09 R44.2@8580,2097.09 R43.1@8710,2097.09
NetC22_2: C22.2 D14.3 R45.2 R46.2 U5.51 | length 2488.3
  Top Layer w10: U5.51@7470,3750 7470,3775 7525,3830 7920,3830 7995,3755 7995,2683.2 8155.21,2522.99 8214.25,2522.99 8225,2512.24 D14.3@8225,2510.28 8463.19,2510.28 C22.2@8470,2517.09 R46.2@8585,2517.09 8590,2512.09 R45.2@8730,2512.09
NetC23_2: C23.2 D15.3 R47.2 R48.2 U5.52 | length 2161.5
  Top Layer w10: U5.52@7450,3755 7450,3804.53 7493.35,3847.87 7927.4,3847.87 8024.29,3750.98 8024.29,3180 8225,2979.29 D15.3@8225,2885.28 8226.81,2887.09 C23.2@8490,2887.09 R48.2@8595,2887.09 R47.2@8755,2887.09
NetC24_2: C24.2 D16.3 R49.1 R50.2 U5.93 | length 1322.9
  Top Layer w10: 6250,2862.2 6380,2862.2 R50.2@6385,2867.2 C24.2@6505,2867.2 D16.3@6740,2867.2 ; R50.2@6385,2880 6385,3074.02 6660.32,3349.33 U5.93@6907.77,3349.33
NetC25_2: C25.2 D17.3 R51.2 R52.2 U5.17 | length 2260.9
  Top Layer w10: U5.17@7313.03,3125.98 7313.03,3111.97 7327.75,3097.25 7337.34,3097.25 7354.59,3080 v1(7360,3080) ; R51.2@8220,3202.56 R51.2@8225,3207.56 ; R51.2@8237.72,3196.81 8226.97,3207.56 R51.2@8225,3207.56 ; R52.2@8420,3207.56 R51.2@8225,3207.56 ; R52.2@8425.4,3207.56 C25.2@8615,3207.56 ; C25.2@8615,3204.49 8620.04,3204.49 8625.2,3209.65 D17.3@8800.63,3209.65 8800.63,3105.63 v1(8740,3045)
  Bottom Layer w10: v1(7360,3080) 7360,3074.59 7377.93,3056.66 7377.93,3052.07 7385,3045 v1(8740,3045)
NetC26_2: C26.2 D18.3 R53.2 R54.2 U5.59 | length 1788.8
  Top Layer w10: U5.59@7312.95,3744.02 7312.95,3667.46 7320,3660.41 v1(7320,3655) ; R53.2@8203.28,3467.2 R53.2@8205.25,3467.2 ; R53.2@8203.28,3477.95 R53.2@8214.03,3467.2 ; v1(8220,3405) R53.2@8220,3477.44 8221.97,3477.44 8360.98,3477.44 8415.74,3532.2 R54.2@8417.71,3532.2 C26.2@8615.42,3532.2 8616.31,3531.31 D18.3@8800.63,3531.31
  Bottom Layer w10: v1(7320,3655) 7370,3605 7695,3605 7895,3405 v1(8220,3405)
NetC27_2: C27.2 D19.3 R55.2 R56.2 U5.54 | length 1556.5
  Top Layer w10: v1(7410,3660) 7411.38,3661.38 U5.54@7411.38,3744.02 ; v1(8070,3750) 8163.2,3843.2 R55.2@8220,3843.2 R56.2@8425,3843.2 C27.2@8615.42,3843.2 8617.39,3843.2 C27.2@8627.17,3852.98 ; C27.2@8628.14,3853.95 C27.2@8627.17,3852.98 ; D19.3@8800.63,3852.98 C27.2@8627.17,3852.98
  Bottom Layer w10: v1(7410,3660) 7980,3660 v1(8070,3750)
NetC28_2: C28.2 D20.3 R57.2 R58.2 U5.53 | length 1564.6
  Top Layer w10: U5.53@7431.06,3769.53 7431.06,3810.87 7595.2,3975 8033.17,3975 8218.03,4159.87 R57.2@8220,4159.87 R58.2@8425,4159.87 C28.2@8610.42,4159.87 ; C28.2@8610.42,4162.9 C28.2@8610.42,4159.87 ; D20.3@8800.63,4174.65 8625.2,4174.65 C28.2@8610.42,4159.87
NetCOMP1_1: COMP1.1 R61.1 | length 354.2
  Top Layer w10: COMP1.1@7596.46,2280 7631.89,2280 7760.94,2150.94 R61.1@7760.94,2014.65
NetCOMP1_2: COMP1.2 R59.2 R60.2 | length 686.2
  Top Layer w10: R59.2@7545,2009.88 R59.2@7552.87,2009.88 ; COMP1.2@7596.46,2330 7561.02,2330 7532.24,2301.22 7532.24,2224.95 7597.4,2159.8 7597.4,2062.28 7577.4,2042.28 7577.4,2034.41 R59.2@7552.87,2009.88 ; R60.2@7759.88,1880 7759.88,1887.87 7637.87,2009.88 R59.2@7552.87,2009.88
NetD1_2: D1.2 R17.1 | length 202.3
  Top Layer w10: D1.2@4365,4695 4406.78,4736.78 R17.1@4406.78,4880
NetD6_2: D6.2 R4.1 | length 200.9
  Top Layer w10: D6.2@4475,3878.93 4486.78,3890.72 R4.1@4486.78,4075
NetD7_2: D7.2 R7.1 | length 200.9
  Top Layer w10: D7.2@4490,2206.08 4501.78,2217.87 R7.1@4501.78,2402.15
NetD8_2: D8.2 R5.1 | length 200.9
  Top Layer w10: D8.2@4490,2763.7 4501.78,2775.48 R5.1@4501.78,2959.76
NetD9_2: D9.2 R6.1 | length 200.9
  Top Layer w10: D9.2@4490,3321.32 4501.78,3333.1 R6.1@4501.78,3517.38
"NetFRONT PANEL_5": "FRONT PANEL.5" R1.1 | length 1086.5
  Top Layer w10: R1.1@10252.56,5005 10345,5005 10440,5100 11070,5100 11185.36,4984.64 11230.36,4984.64 11245.58,4969.42
"NetFRONT PANEL_9": "FRONT PANEL.9" R2.1 | length 678
  Top Layer w10: R2.1@10202.44,4740 10202.44,4743.94 10238.5,4780 10361.77,4780 10426.77,4845 10618.78,4845 cw(c10618.78,4835) 10620.99,4844.75 10673.25,4844.75 10755,4763 ; 10708.07,4759.54 ccw(c10717.64,4762.42) 10714.06,4753.09 10715.79,4752.42 10717.64,4752.42 10750.58,4752.42
"NetFRONT PANEL_14": "FRONT PANEL.14" Q13.3 | length 6526.5
  Top Layer w10: Q13.3@7755.71,2259.65 7875,2259.65 8135,1999.65 9154.65,1999.65 9230,2075 v1(9230,4565)
  Bottom Layer w10: v1(9230,4565) 9235.41,4565 9245.41,4575 9808.56,4575 9858.56,4525 10236.7,4525 10356.7,4645 11411.9,4645 11529.9,4763
NetQ1_4: Q1.4 Q2.3 R8.1 | length 285.6
  Top Layer w10: Q2.3@11046.54,4412.4 11082.84,4412.4 11113.37,4381.87 11113.37,4379.91 11124.11,4369.16 R8.1@11126.08,4369.16 11133.7,4376.77 Q1.4@11309.96,4376.77
NetQ2_1: Q2.1 U1.4 | length 152.7
  Top Layer w10: U1.4@10809.49,4460 10936.93,4460 10947.13,4449.8 Q2.1@10957.95,4449.8
NetQ3_1: Q3.1 R13.2 R14.2 | length 172.9
  Top Layer w10: R14.2@7545,4119.76 7550,4124.76 R13.2@7550,4199.65 7612.28,4199.65 7624.88,4187.05 Q3.1@7635.71,4187.05
NetQ4_1: Q4.1 R15.2 R16.2 | length 157.6
  Top Layer w10: R15.2@7945,4199.65 R15.2@7947.6,4197.05 ; R16.2@7950,4132.2 7950,4194.65 R15.2@7947.6,4197.05 ; Q4.1@8035.71,4197.05 R15.2@7947.6,4197.05
NetQ5_4: Q5.4 R22.2 | length 401.9
  Top Layer w10: Q5.4@5812.72,2329.65 5812.21,2329.14 5812.21,2302.79 5840,2275 6060,2275 6109.65,2324.65 R22.2@6155,2324.65
NetQ6_3: Q6.3 R21.1 R22.1 | length 387.8
  Top Layer w10: R22.1@6155,2269.53 6250,2269.53 6535.59,2269.53 Q6.3@6540.71,2274.65
NetQ7_1: Q7.1 R27.2 | length 171.1
  Top Layer w10: R27.2@10587.56,3290 10587.56,3291.97 10668.54,3372.95 Q7.1@10723.15,3372.95
NetQ8_1: Q8.1 R28.2 | length 327.1
  Top Layer w10: Q8.1@10315.71,3312.4 10326.54,3312.4 10333.35,3319.21 10333.35,3321.65 10526.69,3515 R28.2@10557.44,3515
NetQ9_1: Q9.1 R30.2 R31.2 | length 304.3
  Top Layer w10: Q9.1@10688.15,3872.95 10677.32,3872.95 10670.51,3866.14 10670.51,3836.17 10650.51,3816.17 10650.51,3759.49 10679.88,3730.12 10679.88,3698.58 10724.25,3654.21 10724.25,3636.3 R31.2@10735,3625.55
NetQ10_1: Q10.1 R32.2 | length 168.1
  Top Layer w10: R32.2@10722.56,2590 10811.61,2590 10859.88,2638.27 Q10.1@10870.71,2638.27
NetQ11_1: Q11.1 R35.1 | length 173.9
  Top Layer w10: R35.1@10697.56,2305 10802.14,2305 10803.87,2303.27 Q11.1@10870.71,2303.27
NetQ12_1: Q12.1 R36.1 | length 144.5
  Top Layer w10: R36.1@10087.56,2328.27 10092.56,2323.27 Q12.1@10230,2323.27
NetQ12_3: Q12.3 R34.2 R35.2 | length 465.1
  Top Layer w10: Q12.3@10318.58,2285.87 10625.28,2285.87 R35.2@10642.44,2303.03 ; R35.2@10629.72,2317.72 10631.69,2317.72 10642.44,2306.97 R35.2@10642.44,2305 R35.2@10642.44,2303.03 ; R34.2@10700.12,2215 10700.12,2216.97 10689.37,2227.72 10687.4,2227.72 10642.44,2272.68 R35.2@10642.44,2303.03
NetQ13_1: Q13.1 R61.2 | length 220.4
  Top Layer w10: Q13.1@7844.29,2222.24 7844.29,2053.35 7875.12,2022.52 R61.2@7875.12,2014.65
NetR13_1: R13.1 U5.57 | length 514.8
  Top Layer w10: U5.57@7352.13,3744.02 7352.13,3822.13 7494.88,3964.88 R13.1@7494.88,4199.65
NetR15_1: R15.1 U5.56 | length 722.1
  Top Layer w10: U5.56@7371.93,3769.53 7371.93,3811.93 7552.87,3992.87 7667.87,3992.87 7861.93,4186.93 7879.13,4186.93 7889.88,4197.68 R15.1@7889.88,4199.65
NetR39_1: R39.1 U5.94 | length 173.2
  Top Layer w10: R39.1@6775,3305 6799.65,3329.65 U5.94@6937.95,3329.65
NetU2_1: U2.1 WALL_CONN.1 | length 814.4
  Top Layer w50: WALL_CONN.1@2055,4980 2055,4840 2284.17,4610.83 U2.1@2634.45,4610.83
NetU2_2: U2.2 WALL_CONN.3 | length 1104.7
  Top Layer w50: U2.2@1815.55,4610.83 1815.55,5015.55 1920,5120 2295,5120 2373.33,5041.67 2373.33,4991.67 WALL_CONN.3@2385,4980
NetU2_4: U2.4 XF1.1 XF1.2 | length 2623.2
  Top Layer w50: U2.4@2130.51,2839.17 2130.51,3090.51 3708.07,4668.07 XF1.2@3715.12,4668.07 XF1.1@3715.12,4801.93
NetU5_77: U5.77
NetU5_91: U5.91
NetU5_92: U5.92
NRST: P1.6 STLINK.5 U5.14 | length 2675.5
  Top Layer w10: P1.6@5500,4583 STLINK.5@5682.5,4765.5 ; v1(7210,3325) 7214.99,3325 7253.9,3286.09 U5.14@7253.9,3151.5
  Bottom Layer w10: P1.6@5505,4575 6755,3325 v1(7210,3325)
OSC_IN: C13.1 U5.12 Y1.2 | length 373.2
  Top Layer w10: Y1.2@7073.29,2806.24 Y1.2@7102.05,2835 ; Y1.2@7102.05,2840 7128.2,2866.15 7128.2,2908.2 7187.8,2967.8 7214.53,2994.53 U5.12@7214.53,3125.98
OSC_OUT: C30.2 U5.13 Y1.1 | length 372.3
  Top Layer w10: U5.13@7234.21,3125.98 7234.21,3101.05 7255,3080.27 7255,3045 7317.28,2982.72 7326.69,2982.72 7337.44,2971.97 C30.2@7337.44,2970 7341.86,2965.58 7341.86,2943.14 7365,2920 Y1.1@7365,2813.35
RL1: D12.4 R40.2 | length 260.8
  Top Layer w10: R40.2@7045,4099.76 7046.97,4099.76 7155.63,4208.43 D12.4@7155.63,4313.62
Serial_Rx: STLINK.3 U5.87 | length 2370.7
  Top Layer w10: v1(5845,4345) 5885,4345 6762.56,3467.44 U5.87@6937.95,3467.44
  Bottom Layer w10: v1(5845,4345) 5948.98,4448.98 6023.98,4448.98 6090,4515 6090,4825 6040,4875 5952,4875 STLINK.3@5860,4967
Serial_Tx: STLINK.2 U5.86 | length 2125.6
  Top Layer w10: v1(5805,4425) 5840,4425 6777.87,3487.13 U5.86@6937.95,3487.13
  Bottom Layer w10: STLINK.2@5695,4967 5775,4887 5775,4695 5755,4675 5755,4475 v1(5805,4425)
SHCT_AMS_IMD: AMS1.11 IMD1.12 | length 1225.1
  Bottom Layer w10: AMS1.11@9777.64,4003.98 9690,3916.34 9690,2960.2 IMD1.12@9792.56,2857.64
SHCT_IN: "FRONT PANEL.2" AMS1.12 | length 1779.8
  Top Layer w10: AMS1.12@9769.09,3814.09 AMS1.12@9777.64,3805.55 ; 10705,4980 10705,4913.32 10795,4823.32 v1(10795,4610)
  Bottom Layer w10: AMS1.12@9777.64,3805.55 9787.88,3805.55 10598.8,4616.47 10779.14,4616.47 10781.79,4613.83 10791.95,4613.83 v1@10794.6,4616.47 ; v1@10789.59,4610 v1(10795,4610)
SHCT_INTERLOCK: AUX_TRAY_CONN.22 IMD1.11 | length 3195.4
  Top Layer w10: AUX_TRAY_CONN.22@8585.76,4759.24 9155,4190 9155,3050 v1(8840,2735)
  Bottom Layer w10: v1(8840,2735) 9471.5,2735 IMD1.11@9594.13,2857.64
SHCT_OUT: AUX_TRAY_CONN.20 AUX_TRAY_CONN.21 R11.1 R11.2 R12.2 U1.2 | length 2657.2
  Top Layer w10: v1(10290,4490) 10290,4484.59 10298.03,4476.56 10298.03,4445.12 R11.2@10310.75,4432.4 R11.1@10373.74,4432.4 10378.31,4427.83 R12.2@10567.24,4427.83 10583.9,4444.49 10595.93,4444.49 10648.84,4497.4 U1.2@10715,4497.4
  Top Layer w50: AUX_TRAY_CONN.20@8270,4753 AUX_TRAY_CONN.21@8435,4753
  Bottom Layer w10: AUX_TRAY_CONN.21@8410.55,4759.45 8680,4490 v1(10290,4490)
SHCT_TAP: AUX_TRAY_CONN.10 R53.1 | length 1586
  Top Layer w10: v1(8175,3565) 8178.83,3561.17 8189.42,3561.17 8218.03,3532.56 R53.1@8220,3532.56
  Bottom Layer w10: v1(8175,3565) 8175,3960.01 8314.95,4099.96 8314.95,4655 8345,4685.05 8345,4885 AUX_TRAY_CONN.10@8441.98,4981.98
SWCLK: P1.4 STLINK.1 U5.76 | length 2114.2
  Top Layer w10: P1.4@5705,4575 5718.27,4575 5732.26,4561.01 5733.99,4561.01 6611.02,3683.98 U5.76@6937.95,3683.98
  Bottom Layer w10: STLINK.1@5498.38,5001.62 5530,4970 5530,4885 5610,4805 5610,4670 P1.4@5705,4575
SWDIO: P1.3 STLINK.6 U5.72 | length 1875.4
  Top Layer w10: STLINK.6@5884.72,4764.72 5805,4685 P1.3@5805,4575 5818.27,4575 5832.26,4561.01 5833.99,4561.01 6690,3705 6970.69,3705 6977.19,3698.5 7043.5,3698.5 7057.05,3712.05 U5.72@7057.05,3744.02
SWO: P1.5 U5.89 | length 1834.4
  Top Layer w10: P1.5@5605,4575 5605,4530 6706.93,3428.07 U5.89@6937.95,3428.07
THRS_TRIG_PD: C10.2 N1.2 N1.6 R25.2 | length 672.2
  Top Layer w10: R25.2@6440,2462.56 6523.82,2462.56 6540.47,2479.21 6540.47,2481.5 6570,2481.5 6646.5,2481.5 6684.65,2519.65 6913.73,2519.65 6918.37,2515 6985.67,2515 7031.02,2469.65 N1.6@7066.46,2469.65
TIMER_OUT_PD: N1.3 Q6.1 R24.2 | length 406.4
  Top Layer w10: Q6.1@6629.29,2237.24 6699.61,2307.56 6730,2307.56 6730,2420 6779.65,2469.65 N1.3@6873.54,2469.65
V_CAP_1: C11.2 U5.49 | length 300.4
  Top Layer w10: U5.49@7530.47,3664.29 7608.68,3664.29 7652.97,3620 7757.32,3620 7795,3657.68 C11.2@7795,3659.65
V_CAP_2: C14.2 U5.73 | length 107.7
  Top Layer w10: U5.73@7037.36,3744.02 7037.36,3844.57 C14.2@7042.44,3849.65
VDDA: C12.2 L1.1 U5.22 | length 209
  Top Layer w10: U5.22@7411.38,3135 7411.38,3090.9 7450,3052.28 7450,3053.48 7463.48,3040 C12.2@7553.48,3040
pads on no net: AMS1.14 AMS1.22 COMP1.5 COMP1.6 COMP1.7 IMD1.14 IMD1.22 N1.5 N1.7 Ref1.3 Ref1.5 U1.6 U5.1 U5.2 U5.3 U5.4 U5.5 U5.6 U5.7 U5.8 U5.9 U5.15 U5.16 U5.18 U5.23 U5.24 U5.25 U5.26 U5.29 U5.30 U5.31 U5.32 U5.33 U5.35 U5.36 U5.38 U5.39 U5.41 U5.42 U5.43 U5.44 U5.45 U5.46 U5.47 U5.48 U5.55 U5.58 U5.60 U5.64 U5.65 U5.66 U5.67 U5.68 U5.69 U5.70 U5.71 U5.78 U5.79 U5.80 U5.81 U5.82 U5.83 U5.84 U5.85 U5.88 U5.90 U5.95 U5.96 U5.97 U5.98
copper on no net:
  other v2: 11882,3182.5 5530,5254 5860,5254 6950,5257 8600,5257 9602.5,5257 2055,5267 2385,5267 10540,5267 11529.88,5266.98
  other v3: 1765,1865 11915,1865 11915,5315

## Polygon pours and split planes (outlines as drawn)
GND on Top Layer "GND_L01_P008" (solid, remove dead copper, pour order 8): 3255,5435.56 3255,1720 11500,1720 12039.95,2371.35 12035,4700 11645,5420
GND on Top Layer "GND_L01_P032" (solid, remove dead copper, pour order 32): 1705,2940 1915,2940 1930,2925 1930,2755 3315,2755 3325,2745 3325,2555 1710,2555 1710,2930
GND on Bottom Layer "GND_L02_P033" (solid, remove dead copper, pour order 33): 3240.7,5480 3250.7,5470 12059.14,5470 12080.22,5430.93 12088.18,1725 3270.98,1725
GND on Bottom Layer "GND_L02_P031" (solid, remove dead copper, pour order 31): 1750,2925 1755,2930 1930,2930 1930,2750 3310,2750 3310,2565 3305,2560 1710,2560 1710,2925 1705,2930 1710,2935 1840,2935

## Other copper
Top Layer:
  pour cut-out: 7166.98,3038.66 7206.33,3260 7300,3260 7300,3090 7435,2955 7470,2955 7470,2680 6960,2680 6960,2950 7025,3015
Bottom Layer:
  pour cut-out: 7235,2651.45 7505,2651.45 7505,2940 7350,3095 7350,3220 7165,3220 7165,3020 6945,3020 6945,2648.55 7235,2651.45 7235,2685 6985,2685 6985,2920 7055,2990 7185,2990 7185,3205 7320,3205 7320,3070 7470,2920 7470,2795 7470,2690 7235,2690

## Silkscreen, mask and mechanical layers (free items; w line width, h text height)
Top Overlay:
  drawing of 22 lines, arcs and shapes, not listed
  text "HV" at 2975,4790 h60 r90
  text "LV" at 3215,4785 h60 r90
  text "LV" at 3395,4710 h60 r90
  text "HVB" at 3365,3910 h60 r90
  text "AMS" at 3365,3345 h60 r90
  text "IMD" at 3365,2795 h60 r90
  text "Charge" at 3345.01,2165 h60 r90
  text "ePBR24_ACC_Charging_rev0" at 5870,1819.99 h60
Bottom Overlay:
  lines w10: 1570,4085 2670,4085 3105,4520 3105,5520
  text "LV" at 3220,4725 h60 r90
  text "HV" at 2980,4720 h60 r90
Board Outline:
  the board outline again, w10

## Text inside footprints (layer, text, board x,y; h text height)
12V_SW: Top Overlay "1" at 11633,3347.5 h50 r270; Top Overlay "3" at 11428,3352.5 h50 r270
AUX_TRAY_CONN: Top Overlay "1" at 6858.7,5018.08 h50; Top Overlay "12" at 6849.58,4816.21 h50
EV_CHRG_CONN: Top Overlay "1" at 9437.5,5008 h50; Top Overlay "3" at 9432.5,4803 h50
"FRONT PANEL": Top Overlay "8" at 10440.08,4778.32 h50; Top Overlay "1" at 10457.5,4948 h50
STLINK: Top Overlay "4" at 5432.5,4755 h50; Top Overlay "1" at 5447.5,4935 h50
WALL_CONN: Top Overlay "1" at 1972.5,4948 h50